# Altium PCB NB3000XN.PcbDoc (part 65 of 71)
Units mil, origin at the board's own origin, x right, y up, seen from the top; angles counter-clockwise.
Board outline 9527.56 x 6929.77 mil, 6 copper layers (Top Layer, GND+SHIELD, MidLayer1, MidLayer2, P2 - 3V3+5V0, Bottom Layer), stack 62.375 mil thick; 832 components, 1027 nets, 4655 pads, 4981 vias.
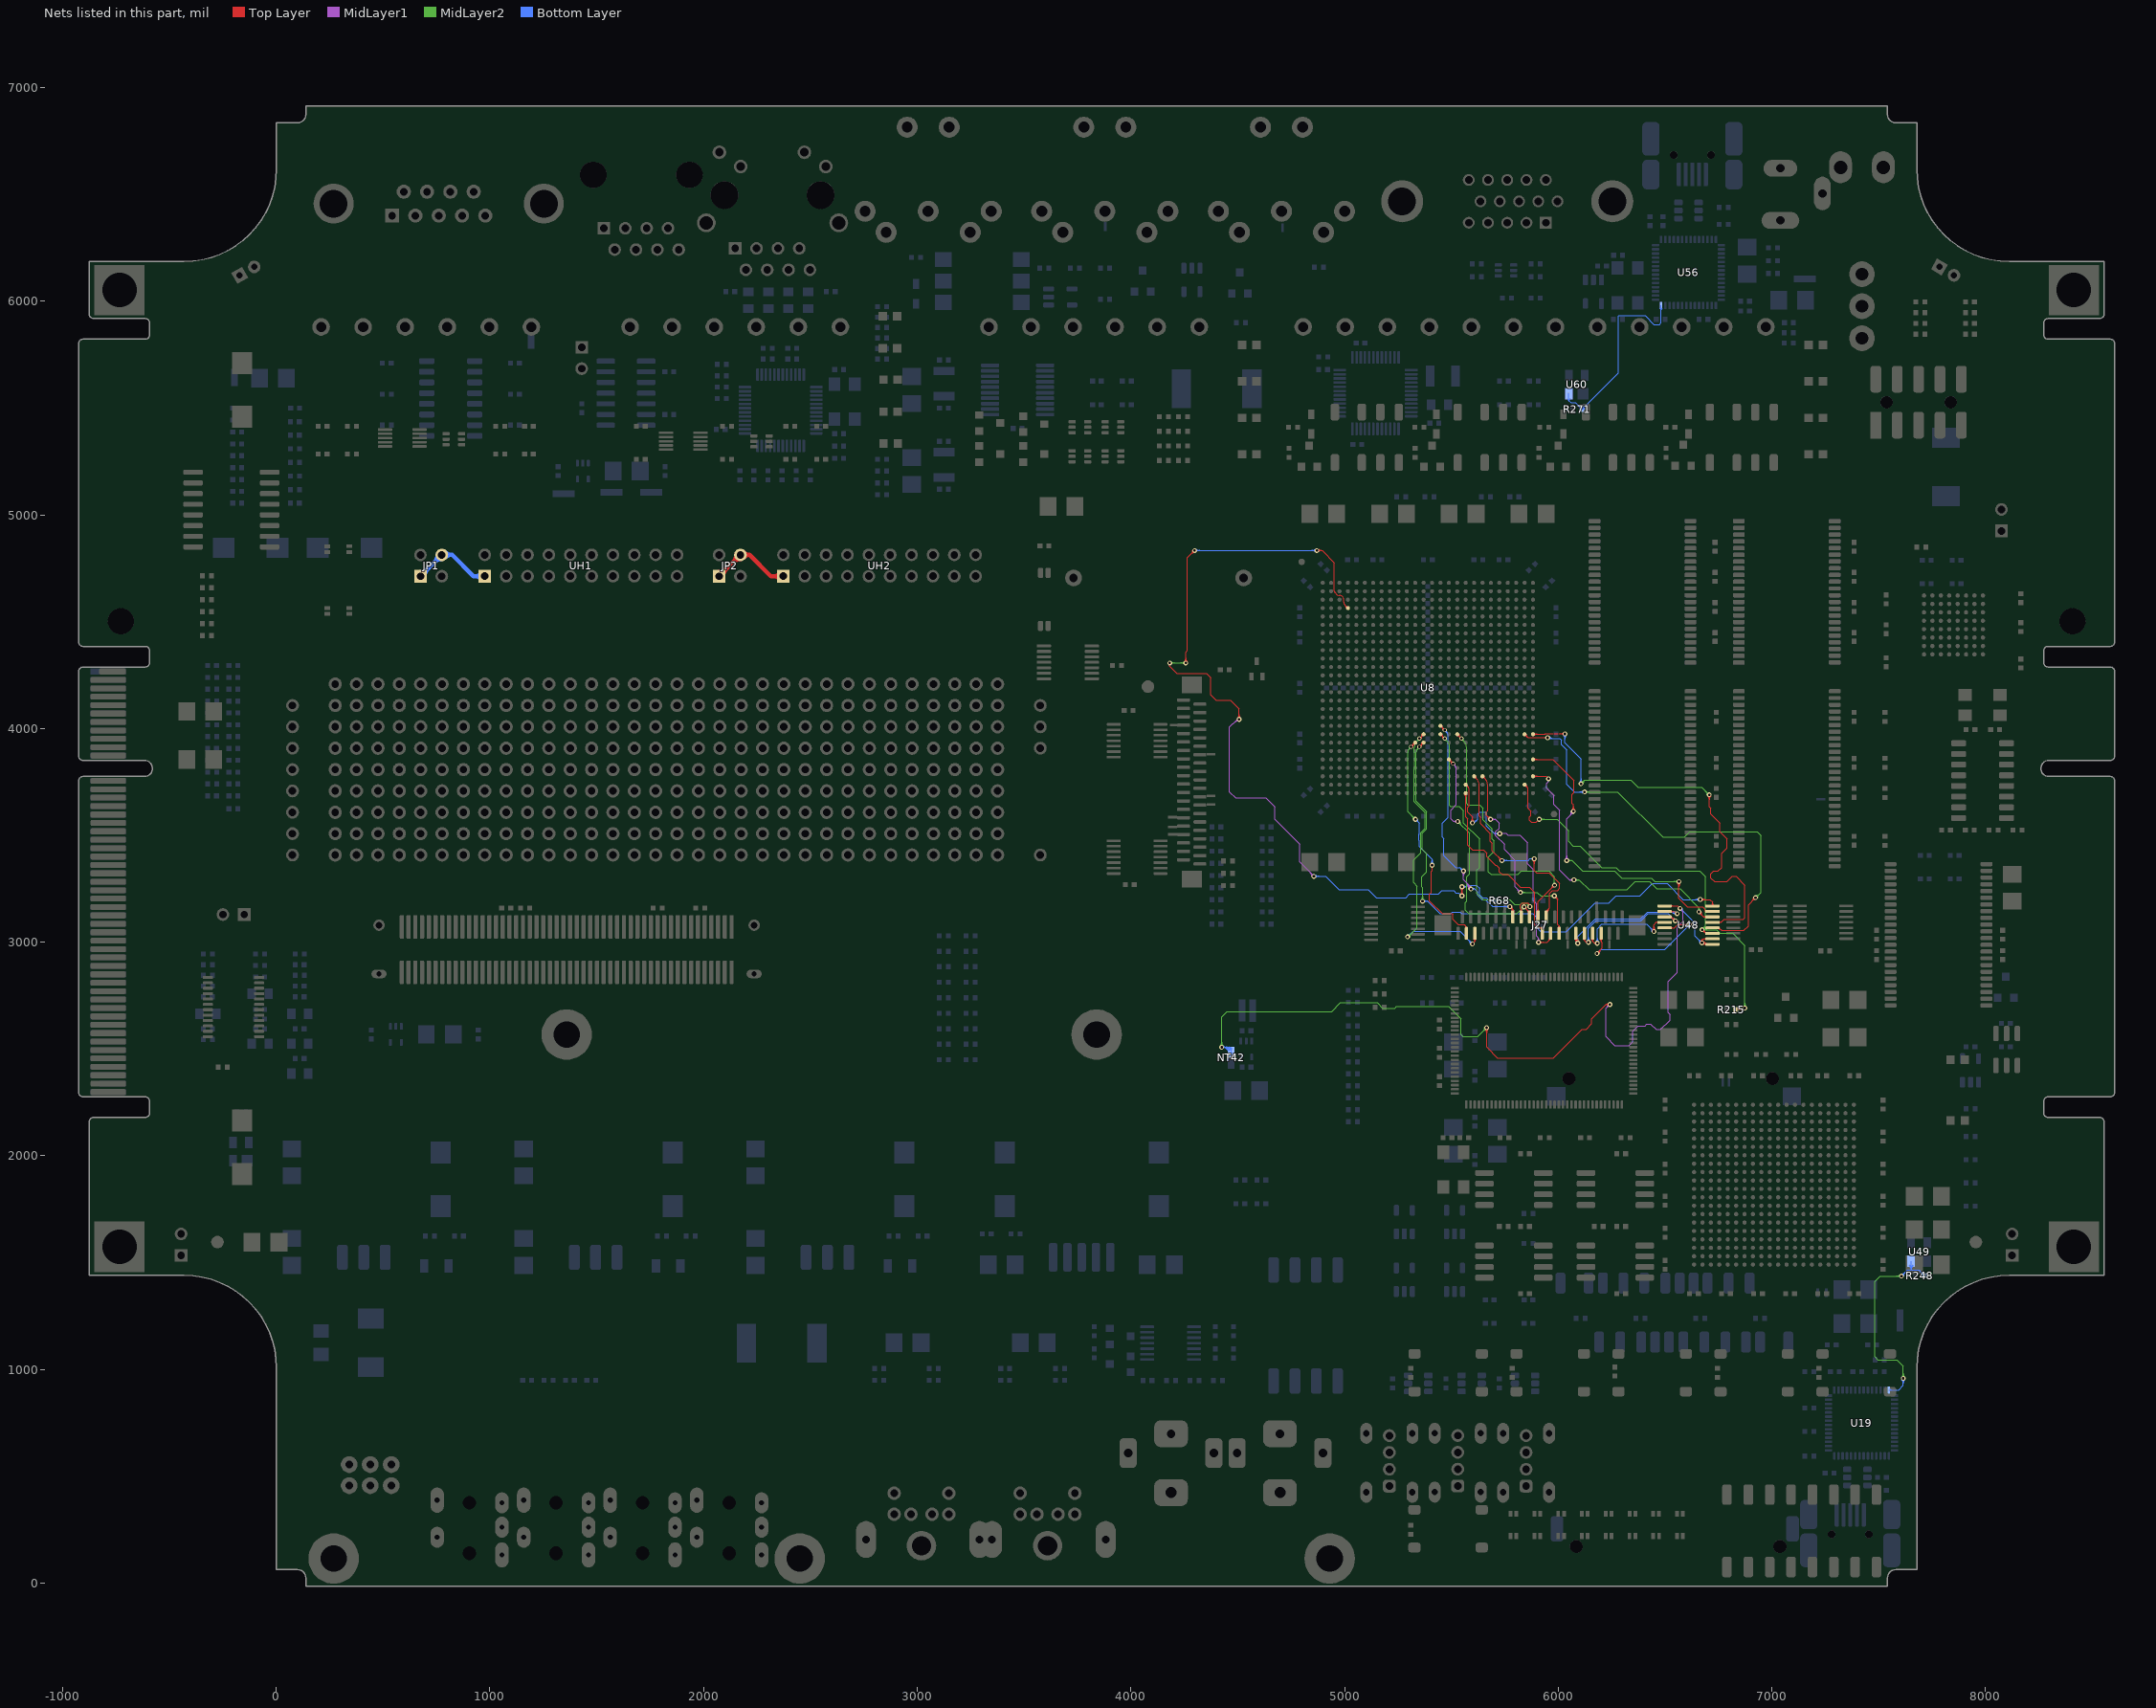
[diagram p69: the nets of this part, all layers, seen from the top]

## Via types
v1: diameter 23, hole 11.81, Top Layer to Bottom Layer, 3672 vias
v2: diameter 26, hole 11.81, Top Layer to Bottom Layer, 461 vias
v3: diameter 19, hole 11.81, Top Layer to Bottom Layer, tented both sides, 396 vias
v4: diameter 23.62, hole 11.81, Top Layer to Bottom Layer, 288 vias
v5: diameter 20, hole 11.81, Top Layer to Bottom Layer, 91 vias
v6: diameter 23, hole 11.81, Top Layer to Bottom Layer, tented both sides, 50 vias
v7: diameter 31, hole 11.81, Top Layer to Bottom Layer, 15 vias
v8: diameter 27.56, hole 11.81, Top Layer to Bottom Layer, tented both sides, 4 vias
v9: diameter 29, hole 11.81, Top Layer to Bottom Layer, 3 vias
v10: diameter 21, hole 11.81, Top Layer to Bottom Layer, 1 vias

## Nets (pads, with @x,y where several pads share a name; then routed paths per layer and width w, separated by ;. In a path a pad name is that pad's centre, name@x,y a point inside that pad or via, vN(x,y) a via of type N, cw(c..) or ccw(c..) an arc to the next point about the centre after c; other vN are vias at no path point) (continued)
TFT_IO.DB14: J27.19 U8.AD19 | length 1217.8
  Top Layer w4: U8.AD19@5606.54,3769.27 cw(c5606.54,3751.55) 5619.07,3764.08 ; U8.AD19@5613.88,3776.61 ccw(c5631.6,3776.61) 5619.07,3764.08 ; v1@5727.36,3382.37 ccw(c5704.42,3382.37) 5720.64,3398.59 ccw(c5736.86,3414.81) v1@5736.86,3391.87 ; v1@5731.36,3382.37 ccw(c5718.08,3382.37) 5727.47,3391.76 ccw(c5736.86,3401.15) v1@5736.86,3387.87 ; v1(5736.86,3382.37) 5691.19,3428.04 5691.19,3463.37 5682.86,3471.71 5682.86,3507.14 5636,3554 5636,3585.19 5630.4,3590.79 5630.4,3599 5630.4,3660 5630.4,3670 5630.4,3736.73 ccw(c5591.72,3736.73) 5619.07,3764.08 ; v1@5881.14,3383.99 cw(c5864.92,3367.77) 5887.86,3367.77 cw(c5910.79,3367.77) v1@5894.57,3383.99 ; v1@5883.97,3386.82 cw(c5874.58,3377.43) 5887.86,3377.43 cw(c5901.14,3377.43) v1@5891.75,3386.82 ; v1(5887.86,3390.71) 5887.86,3335.71 5898.52,3325.04 5956.86,3325.04 6006.86,3275.04 6006.86,3251.71 5996.86,3241.71 5973.52,3241.71 5960,3228.18 5960,3160 5944.95,3144.95 J27.19@5944.95,3118.39 ; J27.19@5946.82,3140.51 cw(c5962.05,3140.51) 5951.28,3151.28 ; J27.19@5950.82,3140.51 cw(c5975.71,3140.51) 5958.11,3158.11
  Bottom Layer w4: v1(5736.86,3382.37) 5859.96,3382.37 5868.29,3390.71 v1(5887.86,3390.71) 5887.86,3385.04 v1@5885.19,3382.37 ; v1@5740.75,3378.49 cw(c5750.14,3369.1) 5750.14,3382.37 cw(c5750.14,3395.65) v1@5740.75,3386.26 ; v1@5743.57,3375.66 cw(c5759.79,3359.44) 5759.79,3382.37 cw(c5759.79,3405.31) v1@5743.57,3389.09
TFT_IO.DB15: J27.21 U8.W17 | length 1570.7
  Top Layer w4: U8.W17@5527.8,3965.96 cw(c5527.8,3947.86) 5540.6,3960.66 cw(c5553.4,3973.46) U8.W17@5535.3,3973.46 ; U8.W17@5527.8,3966.12 cw(c5527.8,3948.4) 5540.33,3960.93 cw(c5552.86,3973.46) U8.W17@5535.14,3973.46 ; U8.W17@5527.8,3973.46 v3(5547.48,3953.78) ; J27.21@5901.42,3144.67 ccw(c5891.4,3154.69) 5905.58,3154.69 ccw(c5919.76,3154.69) J27.21@5909.73,3144.67 ; J27.21@5905.58,3118.39 5905.58,3189.43 v1(5982.86,3266.71) ; v1@5973.36,3266.71 cw(c5950.42,3266.71) 5966.64,3250.49 cw(c5982.86,3234.27) v1@5982.86,3257.21 ; v1@5977.36,3266.71 cw(c5964.08,3266.71) 5973.47,3257.32 cw(c5982.86,3247.93) v1@5982.86,3261.21 ; 5534.68,3966.58 cw(c5521.87,3953.78) 5539.98,3953.78 ccw(c5521.87,3953.78) 5534.68,3966.58 ; 5534.68,3966.58 ccw(c5547.48,3979.39) 5547.48,3961.28 cw(c5547.48,3979.39) 5534.68,3966.58
  MidLayer2 w4: v3@5546.83,3946.31 cw(c5545.25,3928.27) 5559.12,3939.91 ; v3@5554.95,3953.13 ccw(c5572.99,3951.55) 5559.12,3939.91 ; 5571.34,3680.84 5571.34,3739.1 ; v1(5982.86,3266.71) 5982.86,3307.14 5956.63,3333.37 5827.86,3333.37 5811.19,3316.71 5685.48,3316.71 5672.19,3330 5672.19,3398.04 5699.19,3425.04 5699.19,3475.04 5690.86,3483.37 5690.86,3530.02 5648.52,3572.35 5648.52,3600 5648.52,3625.71 5631.86,3642.37 5577.63,3642.37 5571.34,3648.66 5571.34,3660 5571.34,3670 5571.34,3739.1 ; 5559.12,3939.91 cw(c5529.61,3910.4) 5571.34,3910.4 5571.34,3890.9 5571.34,3816.78 5571.34,3797.36 5571.34,3739.1
TFT_IO.DB16: J27.23 U8.AB16 | length 1499.3
  Top Layer w4: U8.AB16@5488.43,3847.85 cw(c5488.43,3829.75) 5501.23,3842.55 cw(c5514.03,3855.35) U8.AB16@5495.93,3855.35 ; U8.AB16@5488.43,3848.01 cw(c5488.43,3830.29) 5500.96,3842.82 cw(c5513.49,3855.35) U8.AB16@5495.77,3855.35 ; U8.AB16@5488.43,3855.35 v3(5508.11,3835.67) ; v1@5840.19,3156.21 cw(c5840.19,3133.27) 5856.41,3149.49 cw(c5872.63,3165.71) v1@5849.69,3165.71 ; v1@5840.19,3160.21 cw(c5840.19,3146.93) 5849.58,3156.32 cw(c5858.97,3165.71) v1@5845.69,3165.71 ; v1(5840.19,3165.71) 5866.21,3139.69 J27.23@5866.21,3118.39 ; 5854.78,3151.12 ccw(c5866.21,3162.55) J27.23@5866.21,3146.39 ; 5856.76,3149.14 cw(c5848.13,3140.51) J27.23@5860.33,3140.51 ; 5495.31,3848.47 cw(c5482.5,3835.67) 5500.61,3835.67 ccw(c5482.5,3835.67) 5495.31,3848.47 ; 5495.31,3848.47 ccw(c5508.11,3861.28) 5508.11,3843.17 cw(c5508.11,3861.28) 5495.31,3848.47
  MidLayer1 w4: 5498.5,3604.17 5498.5,3601.75 ; v3@5507.46,3828.2 cw(c5505.88,3810.16) 5519.75,3821.8 cw(c5533.62,3833.44) v3@5515.58,3835.02 ; 5517.88,3565.37 cw(c5517.88,3555.43) v1@5525.68,3561.59 ; 5519.5,3822.09 cw(c5509.57,3812.16) 5523.62,3812.16 5523.62,3718.62 5523.62,3670 5523.62,3660 5523.62,3650.04 ; v1@5522.54,3559.11 ccw(c5509.63,3548.92) 5509.63,3565.37 ; v1@5522.91,3571.33 cw(c5509.63,3583.18) 5509.63,3565.37 ; 5523.52,3650.04 5523.52,3644.37 5497.5,3618.35 5497.5,3602.75 5498.5,3601.75 ; v1@5530,3565.37 5509.63,3565.37 ; 5498.5,3601.75 5498.5,3576.5 5509.63,3565.37
  MidLayer2 w4: v1@5530,3555.5 cw(c5530,3532.56) 5546.22,3548.78 cw(c5562.43,3565) v1@5539.5,3565 ; v1@5530,3559.5 cw(c5530,3546.22) 5539.39,3555.61 cw(c5548.78,3565) v1@5535.5,3565 ; v1@5531.86,3565 5531.86,3565.37 5531.48,3565 v1(5530,3565) 5585,3510 5585,3319.75 5572.5,3307.25 5572.5,3193.02 5565.19,3185.71 5565.19,3150.04 5581.86,3133.37 5807.86,3133.37 v1(5840.19,3165.71) ; v1@5830.69,3165.71 cw(c5807.76,3165.71) 5823.97,3149.49 cw(c5840.19,3133.27) v1@5840.19,3156.21 ; v1@5834.69,3165.71 cw(c5821.41,3165.71) 5830.8,3156.32 cw(c5840.19,3146.93) v1@5840.19,3160.21
TFT_IO.DB17: J27.25 U8.W15 | length 1532.1
  Top Layer w4: U8.W15@5449.06,3965.96 cw(c5449.06,3947.86) 5461.86,3960.66 cw(c5474.66,3973.46) U8.W15@5456.56,3973.46 ; U8.W15@5449.06,3966.12 cw(c5449.06,3948.4) 5461.59,3960.93 cw(c5474.12,3973.46) U8.W15@5456.4,3973.46 ; U8.W15@5449.06,3973.46 v3(5468.74,3953.78) ; J27.25@5822.76,3144.75 ccw(c5813.56,3154.31) 5826.84,3154.31 ; J27.25@5826.84,3118.39 5826.84,3154.31 ; J27.25@5830.91,3144.75 cw(c5840.11,3154.31) 5826.84,3154.31 ; 5859.36,3183.21 cw(c5849.77,3173.63) v1@5862.4,3168.71 ; 5863.69,3178.88 cw(c5856.01,3171.2) v1@5866.13,3167.25 ; v1(5867.52,3166.71) 5867.52,3175.04 5859.19,3183.37 5831.86,3183.37 5822.69,3174.21 5822.69,3158.46 5826.84,3154.31 ; 5455.94,3966.58 cw(c5443.13,3953.78) 5461.24,3953.78 ccw(c5443.13,3953.78) 5455.94,3966.58 ; 5455.94,3966.58 ccw(c5468.74,3979.39) 5468.74,3961.28 cw(c5468.74,3979.39) 5455.94,3966.58
  MidLayer2 w4: v3@5468.09,3946.31 cw(c5466.51,3928.27) 5480.38,3939.91 ; v3@5476.21,3953.13 ccw(c5494.25,3951.55) 5480.38,3939.91 ; 5492.6,3680.84 5492.6,3739.1 ; v1@5858.02,3166.71 ccw(c5835.09,3166.71) 5851.31,3182.93 ccw(c5867.52,3199.14) v1@5867.52,3176.21 ; v1@5862.02,3166.71 ccw(c5848.75,3166.71) 5858.14,3176.1 ccw(c5867.52,3185.49) v1@5867.52,3172.21 ; v1(5867.52,3166.71) 5850.86,3183.37 5830,3183.37 5823.33,3176.71 5796.86,3176.71 5773.52,3200.04 5648.52,3200.04 5619.5,3229.06 5619.5,3337.68 5631.86,3350.04 5631.86,3483.37 5556.86,3558.37 5556.86,3616.04 5556.53,3616.37 5536.9,3636 5496.6,3636 5492.6,3640 5492.6,3660 5492.6,3670 5492.6,3739.1 ; 5480.38,3939.91 cw(c5450.87,3910.4) 5492.6,3910.4 5492.6,3890.9 5492.6,3816.78 5492.6,3797.36 5492.6,3739.1
TFT_IO.IR38KRX: J27.36 U8.W13 | length 1741.3
  Top Layer w4: v3(5350.63,3953.78) U8.W13@5370.31,3973.46 ; U8.W13@5362.81,3973.46 cw(c5344.71,3973.46) 5357.51,3960.66 cw(c5370.31,3947.86) U8.W13@5370.31,3965.96 ; U8.W13@5362.97,3973.46 cw(c5345.25,3973.46) 5357.78,3960.93 cw(c5370.31,3948.4) U8.W13@5370.31,3966.12 ; v1(5598.52,2991.71) 5610.3,3003.48 J27.36@5610.3,3041.61 ; J27.36@5606.15,3015.33 cw(c5596.12,3005.31) 5610.3,3005.31 cw(c5624.48,3005.31) J27.36@5614.45,3015.33 ; 5363.43,3966.58 ccw(c5376.24,3953.78) 5358.13,3953.78 cw(c5376.24,3953.78) 5363.43,3966.58 ; 5363.43,3966.58 cw(c5350.63,3979.39) 5350.63,3961.28 ccw(c5350.63,3979.39) 5363.43,3966.58
  MidLayer2 w4: v1(5295,3025) 5298.48,3025 5298.52,3025.04 5340.19,3066.71 5340.19,3261.35 5322.52,3279.02 5322.52,3385.04 5356.7,3419.22 5356.7,3513.31 5377,3533.61 5377,3607.31 5326.77,3657.55 5326.77,3660 5326.77,3670 5326.77,3797.36 5326.77,3816.78 5326.77,3890.9 5326.77,3910.4 cw(c5368.5,3910.4) 5338.99,3939.91 ; v1@5295,3030.5 ccw(c5295,3052.19) 5310.34,3036.85 ; v1@5295,3034.5 ccw(c5295,3065.84) 5317.16,3043.68 ; v1@5304.5,3025 cw(c5319.03,3025) 5308.75,3035.27 ; v3@5343.16,3953.13 cw(c5325.12,3951.55) 5338.99,3939.91 ; v3@5351.28,3946.31 ccw(c5352.86,3928.27) 5338.99,3939.91
  Bottom Layer w4: v1(5295,3025) 5320.37,3050.37 5539.86,3050.37 v1(5598.52,2991.71) ; v1@5295,3030.5 ccw(c5295,3043.78) 5304.39,3034.39 ccw(c5313.78,3025) v1@5300.5,3025 ; v1@5295,3034.5 ccw(c5295,3057.43) 5311.22,3041.22 ccw(c5327.43,3025) v1@5304.5,3025 ; v1@5589.02,2991.71 ccw(c5566.09,2991.71) 5582.31,3007.93 ccw(c5598.52,3024.14) v1@5598.52,3001.21 ; v1@5593.02,2991.71 ccw(c5579.75,2991.71) 5589.14,3001.1 ccw(c5598.52,3010.49) v1@5598.52,2997.21
TFT_IO.IR38KTX: J27.38 U8.Y12 | length 1411.3
  Top Layer w4: v3(5311.26,3914.41) U8.Y12@5330.94,3934.09 ; U8.Y12@5323.44,3934.09 cw(c5305.34,3934.09) 5318.14,3921.29 cw(c5330.94,3908.49) U8.Y12@5330.94,3926.59 ; U8.Y12@5323.6,3934.09 cw(c5305.88,3934.09) 5318.41,3921.56 cw(c5330.94,3909.03) U8.Y12@5330.94,3926.75 ; v1(5410,3360) 5410,3334.96 5406,3330.96 5406,3232.52 5398.52,3225.04 5398.52,3191.71 5456.86,3133.37 5505.19,3133.37 5506.86,3131.71 5506.86,3107.04 5531.86,3082.04 5560.34,3082.04 5570.93,3071.45 J27.38@5570.93,3041.61 ; 5562.95,3079.44 cw(c5548.16,3064.65) J27.38@5569.06,3063.81 ; 5569.41,3072.97 cw(c5560.59,3064.15) J27.38@5573.06,3063.66 ; 5324.06,3927.21 cw(c5311.26,3940.02) 5311.26,3921.91 ccw(c5311.26,3940.02) 5324.06,3927.21 ; 5324.06,3927.21 ccw(c5336.87,3914.41) 5318.76,3914.41 cw(c5336.87,3914.41) 5324.06,3927.21
  MidLayer2 w4: 5295.75,3876.97 5295.75,3890.9 ; 5299.87,3900.83 ccw(c5309.8,3890.9) 5295.75,3890.9 ; v3@5303.79,3913.76 cw(c5285.75,3912.18) 5299.62,3900.54 cw(c5313.49,3888.9) v3@5311.91,3906.94 ; v1@5322.36,3575.04 ccw(c5299.42,3575.04) 5315.64,3591.26 ccw(c5331.86,3607.48) v1@5331.86,3584.54 ; v1@5326.36,3575.04 ccw(c5313.08,3575.04) 5322.47,3584.43 ccw(c5331.86,3593.82) v1@5331.86,3580.54 ; v1(5331.86,3575.04) 5295.75,3611.15 5295.75,3660 5295.75,3670 5295.75,3797.36 5295.75,3890.9
  Bottom Layer w4: v1@5331.86,3565.54 cw(c5331.86,3542.61) 5348.07,3558.82 cw(c5364.29,3575.04) v1@5341.36,3575.04 ; v1@5331.86,3569.54 cw(c5331.86,3556.26) 5341.25,3565.65 cw(c5350.64,3575.04) v1@5337.36,3575.04 ; v1(5331.86,3575.04) 5349.86,3557.04 5349.86,3506.14 5348.7,3504.99 5348.7,3477.23 5349.86,3476.08 5349.86,3448.37 5389.06,3409.18 5410,3388.23 v1(5410,3360) ; v1@5403.28,3366.72 ccw(c5387.06,3382.93) 5410,3382.93 ccw(c5432.93,3382.93) v1@5416.72,3366.72 ; v1@5406.11,3363.89 ccw(c5396.72,3373.28) 5410,3373.28 ccw(c5423.28,3373.28) v1@5413.89,3363.89
TFT_IO.RD: J27.16 U8.AD20 | length 1421.1
  Top Layer w4: v1@5674.02,3575.04 ccw(c5651.09,3575.04) 5667.31,3591.26 ccw(c5683.52,3607.48) v1@5683.52,3584.54 ; v1@5678.02,3575.04 ccw(c5664.75,3575.04) 5674.14,3584.43 ccw(c5683.52,3593.82) v1@5683.52,3580.54 ; v1(5683.52,3575.04) 5664.52,3594.04 5664.52,3610.46 5669.77,3615.7 5669.77,3660 5669.77,3670 5669.77,3736.73 ; v1@5981.86,3207.21 cw(c5981.86,3184.27) 5998.07,3200.49 cw(c6014.29,3216.71) v1@5991.36,3216.71 ; v1@5981.86,3211.21 cw(c5981.86,3197.93) 5991.25,3207.32 cw(c6000.64,3216.71) v1@5987.36,3216.71 ; v1(5981.86,3216.71) 5998.52,3200.04 5998.52,3083.37 6004,3077.9 ; J27.16@5999.85,3067.9 ccw(c5989.88,3077.9) 6004,3077.9 ; J27.16@6004,3041.61 6004,3077.9 ; J27.16@6008.15,3067.9 cw(c6018.12,3077.9) 6004,3077.9 ; 5658.44,3764.08 cw(c5631.09,3736.73) 5669.77,3736.73 ; 5658.44,3764.08 cw(c5631.09,3736.73) 5669.77,3736.73 ; 5658.44,3764.08 cw(c5670.97,3776.61) 5653.25,3776.61 ccw(c5670.97,3776.61) 5658.44,3764.08 ; 5658.44,3764.08 ccw(c5645.91,3751.55) 5645.91,3769.27 cw(c5645.91,3751.55) 5658.44,3764.08
  MidLayer1 w4: v1(5683.52,3575.04) 5706.86,3575.04 5723.52,3558.37 5723.52,3533.37 5706.86,3516.71 5706.86,3500.04 5748.52,3458.37 5748.52,3433.37 5798.52,3383.37 5798.52,3260.04 5823.52,3235.04 v1(5823.52,3233.37) ; v1@5687.41,3571.15 cw(c5696.8,3561.76) 5696.8,3575.04 cw(c5696.8,3588.32) v1@5687.41,3578.93 ; v1@5690.24,3568.32 cw(c5706.46,3552.11) 5706.46,3575.04 cw(c5706.46,3597.98) v1@5690.24,3581.76 ; 5806.13,3252.44 cw(c5787.07,3233.37) v1@5814.02,3233.37 ; 5810.15,3248.41 ccw(c5823.52,3261.79) v1@5823.52,3242.87 ; 5812.96,3245.61 cw(c5800.72,3233.37) v1@5818.02,3233.37
  MidLayer2 w4: v1(5823.52,3233.37) 5901.52,3233.37 5918.19,3216.71 v1(5981.86,3216.71) ; v1@5827.41,3229.49 cw(c5836.8,3220.1) 5836.8,3233.37 cw(c5836.8,3246.65) v1@5827.41,3237.26 ; v1@5830.24,3226.66 cw(c5846.46,3210.44) 5846.46,3233.37 cw(c5846.46,3256.31) v1@5830.24,3240.09 ; v1@5975.14,3209.99 ccw(c5958.92,3193.77) 5958.92,3216.71 ccw(c5958.92,3239.64) v1@5975.14,3223.43 ; v1@5977.97,3212.82 ccw(c5968.58,3203.43) 5968.58,3216.71 ccw(c5968.58,3229.99) v1@5977.97,3220.6
TFT_IO.RESET: J27.27 U8.V15 | length 1679.6
  Top Layer w4: U8.V15@5449.06,4005.33 cw(c5449.06,3987.23) 5461.86,4000.03 cw(c5474.66,4012.83) U8.V15@5456.56,4012.83 ; U8.V15@5449.06,4005.49 cw(c5449.06,3987.77) 5461.59,4000.3 cw(c5474.12,4012.83) U8.V15@5456.4,4012.83 ; U8.V15@5449.06,4012.83 v3(5468.74,3993.15) ; v1@5773.52,3157.21 cw(c5773.52,3134.27) 5789.74,3150.49 cw(c5805.96,3166.71) v1@5783.02,3166.71 ; v1@5773.52,3161.21 cw(c5773.52,3147.93) 5782.91,3157.32 cw(c5792.3,3166.71) v1@5779.02,3166.71 ; v1(5773.52,3166.71) 5790.19,3150.04 ; v1@5775.6,3164.63 cw(c5751.49,3140.51) J27.27@5785.59,3140.51 ; 5782.43,3157.8 cw(c5765.14,3140.51) J27.27@5789.59,3140.51 ; J27.27@5786.86,3146.35 ccw(c5786.49,3150.04) 5790.19,3150.04 ; J27.27@5787.47,3118.39 5787.47,3116.71 5790.19,3116.71 5790.19,3118.39 5790.19,3150.04 ; 5789.26,3150.97 cw(c5778.8,3140.51) J27.27@5793.59,3140.51 ; J27.27@5790.19,3148.12 ccw(c5795.07,3148.12) J27.27@5791.62,3144.67 ; 5455.94,4005.95 cw(c5443.13,3993.15) 5461.24,3993.15 ccw(c5443.13,3993.15) 5455.94,4005.95 ; 5455.94,4005.95 ccw(c5468.74,4018.76) 5468.74,4000.65 cw(c5468.74,4018.76) 5455.94,4005.95
  MidLayer1 w4: v1@5550.14,3326.66 cw(c5533.92,3310.44) 5556.86,3310.44 cw(c5579.79,3310.44) v1@5563.57,3326.66 ; v1@5552.97,3329.49 cw(c5543.58,3320.1) 5556.86,3320.1 cw(c5570.14,3320.1) v1@5560.75,3329.49 ; v1(5556.86,3333.37) 5556.86,3293.04 5591.52,3258.37 v1(5591.52,3249) ; 5568.68,3281.22 cw(c5536.46,3249) v1@5582.02,3249 ; 5575.51,3274.39 cw(c5550.11,3249) v1@5586.02,3249 ; 5582.33,3267.56 cw(c5563.77,3249) v1@5590.02,3249 ; 5589.16,3260.74 cw(c5577.43,3249) v1@5594.02,3249
  Bottom Layer w4: v3@5468.09,3985.68 cw(c5466.51,3967.64) 5480.38,3979.28 cw(c5494.25,3990.92) v3@5476.21,3992.5 ; 5480.13,3979.57 cw(c5470.2,3969.64) 5484.25,3969.64 5484.25,3876.1 5484.25,3670 5484.25,3660 5484.25,3584.76 5457.8,3558.31 5457.8,3491.44 5465.19,3484.05 5465.19,3406.12 5521.31,3350 5540.23,3350 v1(5556.86,3333.37) ; v1@5547.36,3333.37 ccw(c5524.42,3333.37) 5540.64,3349.59 ccw(c5556.86,3365.81) v1@5556.86,3342.87 ; v1@5551.36,3333.37 ccw(c5538.08,3333.37) 5547.47,3342.76 ccw(c5556.86,3352.15) v1@5556.86,3338.87 ; v1(5591.52,3249) 5591.52,3250.04 5608.19,3250.04 ; v1@5599.19,3254.61 ccw(c5608.19,3261.19) 5608.19,3250.04 ; v1@5600.11,3244.93 cw(c5608.19,3241.1) 5608.19,3250.04 ; v1@5766.81,3159.99 ccw(c5750.59,3143.77) 5750.59,3166.71 ccw(c5750.59,3189.64) v1@5766.81,3173.43 ; v1@5769.64,3162.82 ccw(c5760.25,3153.43) 5760.25,3166.71 ccw(c5760.25,3179.99) v1@5769.64,3170.6 ; v1(5773.52,3166.71) 5692.52,3166.71 5660.19,3199.04 5642.88,3199.04 5623.52,3218.39 5623.52,3234.71 5608.19,3250.04
TFT_IO.RS: J27.20 U8.AF18 | length 971.7
  Top Layer w4: U8.AF18@5561.86,3692.57 cw(c5549.06,3679.77) 5567.17,3679.77 cw(c5585.27,3679.77) U8.AF18@5572.47,3692.57 ; U8.AF18@5561.97,3692.68 cw(c5549.44,3680.15) 5567.17,3680.15 cw(c5584.89,3680.15) U8.AF18@5572.36,3692.68 ; U8.AF18@5567.17,3697.87 5567.17,3670 5567.17,3660 5567.17,3586.59 5576.81,3576.94 5576.81,3455.34 5599.61,3432.54 5649.36,3432.54 5649.52,3432.37 5665.19,3416.71 5665.19,3401.71 5705.86,3361.04 5710.19,3361.04 5723.52,3347.71 5723.52,3330 5736.82,3316.71 5765.19,3316.71 5823.52,3258.37 5865.19,3258.37 5890.19,3233.37 5890.19,3080.71 5893.19,3077.71 5904.19,3077.71 5923.52,3058.37 5923.52,3041.71 5925.26,3041.71 J27.20@5925.26,3041.61 ; 5907.74,3074.16 ccw(c5920.1,3086.51) J27.20@5923.96,3069.47 ; 5912.87,3069.03 ccw(c5922,3078.15) J27.20@5924.85,3065.57
TFT_IO.WR: J27.18 U8.AE18 | length 1481.3
  Top Layer w4: U8.AE18@5567.17,3729.9 cw(c5567.17,3712.17) 5579.7,3724.71 ; U8.AE18@5574.51,3737.24 ccw(c5592.23,3737.24) 5579.7,3724.71 ; v1@5590.19,3558.37 v1(5598.52,3558.37) 5598.52,3586 5576.69,3607.83 5576.69,3631.96 5582.67,3637.94 5582.67,3660 5582.67,3670 5582.67,3717.53 ccw(c5572.52,3717.53) 5579.7,3724.71 ; v1@5591.81,3565.09 ccw(c5575.59,3581.31) 5598.52,3581.31 ccw(c5621.46,3581.31) v1@5605.24,3565.09 ; v1@5594.64,3562.26 ccw(c5585.25,3571.65) 5598.52,3571.65 ccw(c5611.8,3571.65) v1@5602.41,3562.26 ; v1(5907.86,2999.04) 5947.52,2999.04 5965.19,3016.71 5965.19,3041.61 5965.19,3041.71 5964.63,3041.71 J27.18@5964.63,3041.61 ; v1@5911.75,2995.15 cw(c5921.14,2985.76) 5921.14,2999.04 cw(c5921.14,3012.32) v1@5911.75,3002.93 ; v1@5914.57,2992.32 cw(c5930.79,2976.11) 5930.79,2999.04 cw(c5930.79,3021.98) v1@5914.57,3005.76 ; 5952.24,3003.76 ccw(c5936.52,3019.49) J27.18@5958.76,3019.49 ; 5959.07,3010.59 ccw(c5950.17,3019.49) J27.18@5962.76,3019.49 ; J27.18@5960.3,3011.82 cw(c5964.63,3007.49) J27.18@5964.63,3013.61
  MidLayer1 w4: v1(5726.52,3508.37) 5727.52,3509.37 5756.86,3509.37 5765.19,3501.04 5820.52,3501.04 5856.86,3464.71 5856.86,3395 5856.86,3366.83 5882.86,3340.83 5882.86,3324.04 5882.86,3315 5882.86,3194.69 5898.19,3179.36 5898.19,3027.75 5907.86,3018.08 ; v1@5902.14,3006.63 ccw(c5893.53,3018.08) 5907.86,3018.08 ; v1(5907.86,2999.04) 5907.86,3018.08 ; v1@5913.57,3006.63 cw(c5922.18,3018.08) 5907.86,3018.08
  Bottom Layer w4: v1(5598.52,3558.37) 5606.86,3558.37 5623.52,3575.04 ; v1@5598.79,3559.85 ccw(c5601.57,3575.34) 5612.7,3564.21 ; v1@5599.5,3563.79 ccw(c5603.22,3584.52) 5618.11,3569.63 ; v1@5600.2,3567.73 ccw(c5604.86,3593.7) 5623.52,3575.04 ; v1@5719.81,3501.66 ccw(c5703.59,3485.44) 5703.59,3508.37 ccw(c5703.59,3531.31) v1@5719.81,3515.09 ; v1@5722.64,3504.49 ccw(c5713.25,3495.1) 5713.25,3508.37 ccw(c5713.25,3521.65) v1@5722.64,3512.26 ; v1@5724.86,3500.04 5726.52,3501.71 v1(5726.52,3508.37) 5701.63,3508.37 5664.96,3545.04 5664.86,3545.04 5664.86,3606.71 5663.19,3608.37 5631.86,3608.37 5623.52,3600.04 5623.52,3575.04
TFT_TOUCH.X+: J27.12 U48.2 | length 995.1
  Top Layer w4: J27.12@6078.59,3015.33 cw(c6068.56,3005.31) 6082.74,3005.31 cw(c6096.92,3005.31) J27.12@6086.9,3015.33 ; 6082.74,3010.54 ccw(c6106.69,3010.54) v1@6089.76,2993.61 ; J27.12@6082.74,3020.2 ccw(c6116.35,3020.2) v1@6092.58,2996.44 ; J27.12@6082.74,3029.85 ccw(c6126,3029.85) v1@6095.41,2999.26 ; J27.12@6082.74,3039.51 ccw(c6135.66,3039.51) v1@6098.24,3002.09 ; J27.12@6082.74,3041.61 6082.74,3004.16 v1(6091.52,2995.37) ; U48.2@6497.8,3143.98 6546.26,3143.98 v1(6556.86,3133.37) ; U48.2@6527.83,3140.52 cw(c6536.17,3132.17) 6536.17,3143.98 cw(c6536.18,3155.78) U48.2@6527.83,3147.43
  Bottom Layer w4: v1@6084.81,3002.09 ccw(c6068.59,3018.31) 6091.52,3018.31 ccw(c6114.46,3018.31) v1@6098.24,3002.09 ; v1@6087.64,2999.26 ccw(c6078.25,3008.65) 6091.52,3008.65 ccw(c6104.8,3008.65) v1@6095.41,2999.26 ; v1(6091.52,2995.37) 6091.52,3026.06 6173.84,3108.37 6384.84,3108.37 6418.17,3141.71 6445,3141.71 6548.52,3141.71 v1(6556.86,3133.37) ; 6513.8,3141.71 cw(c6513.8,3090.32) v1@6550.14,3126.66 ; 6523.46,3141.71 cw(c6523.46,3099.98) v1@6552.97,3129.49 ; 6533.12,3141.71 cw(c6533.12,3109.64) v1@6555.8,3132.31 ; 6542.78,3141.71 cw(c6542.78,3119.29) v1@6558.62,3135.14
TFT_TOUCH.X-: J27.8 U48.4 | length 714.7
  Top Layer w4: J27.8@6157.33,3015.33 cw(c6147.3,3005.31) 6161.48,3005.31 cw(c6175.66,3005.31) J27.8@6165.64,3015.33 ; J27.8@6161.48,3041.61 6161.48,3003.37 6169.48,2995.37 v1(6183.19,2995.37) ; v1@6441.81,3056.76 ccw(c6425.59,3072.98) 6448.52,3072.98 ccw(c6471.46,3072.98) v1@6455.24,3056.76 ; v1@6444.64,3053.93 ccw(c6435.25,3063.32) 6448.52,3063.32 ccw(c6461.8,3063.32) v1@6452.41,3053.93 ; v1(6448.52,3050.04) 6448.52,3081.37 6459.94,3092.79 ; U48.4@6467.65,3089.45 ccw(c6459.94,3082.24) 6459.94,3092.79 ; U48.4@6467.65,3096.14 cw(c6459.94,3103.35) 6459.94,3092.79 ; U48.4@6497.8,3092.8 6459.94,3092.79
  Bottom Layer w4: v1@6176.47,3002.09 ccw(c6160.26,3018.31) 6183.19,3018.31 ccw(c6206.13,3018.31) v1@6189.91,3002.09 ; v1@6179.3,2999.26 ccw(c6169.91,3008.65) 6183.19,3008.65 ccw(c6196.47,3008.65) v1@6187.08,2999.26 ; v1(6183.19,2995.37) 6183.19,3063.19 6204.04,3084.04 6414.52,3084.04 v1(6448.52,3050.04) ; v1@6439.02,3050.04 ccw(c6416.09,3050.04) 6432.31,3066.26 ccw(c6448.52,3082.48) v1@6448.52,3059.54 ; v1@6443.02,3050.04 ccw(c6429.75,3050.04) 6439.14,3059.43 ccw(c6448.52,3068.82) v1@6448.52,3055.54
TFT_TOUCH.Y+: J27.10 U48.3 | length 846.7
  Top Layer w4: J27.10@6118.8,3014.63 cw(c6114.54,3008.38) 6122.11,3008.38 ; J27.10@6122.11,3041.61 6122.11,3008.37 ; J27.10@6125.42,3014.63 ccw(c6129.69,3008.38) 6122.11,3008.38 ; v1(6141.52,3000.04) 6130.45,3000.04 6122.11,3008.37 ; U48.3@6497.8,3118.39 6530.18,3118.39 v1(6548.52,3100.04) ; U48.3@6524.37,3113.5 cw(c6524.37,3087.67) v1@6542.63,3105.93 ; U48.3@6524.37,3117.5 cw(c6524.37,3101.32) 6535.81,3112.76 ; v1@6539.02,3100.04 ccw(c6516.09,3100.04) 6532.31,3116.26 ccw(c6548.52,3132.48) v1@6548.52,3109.54 ; v1@6543.02,3100.04 ccw(c6529.75,3100.04) 6539.14,3109.43 ccw(c6548.52,3118.82) v1@6548.52,3105.54
  Bottom Layer w4: v1@6134.81,3006.76 ccw(c6118.59,3022.98) 6141.52,3022.98 ccw(c6164.46,3022.98) v1@6148.24,3006.76 ; v1@6137.64,3003.93 ccw(c6128.25,3013.32) 6141.52,3013.32 ccw(c6154.8,3013.32) v1@6145.41,3003.93 ; v1(6141.52,3000.04) 6141.52,3064.75 6176.82,3100.04 6387.82,3100.04 6421.15,3133.37 6465,3133.37 6515.19,3133.37 v1(6548.52,3100.04) ; v1@6539.02,3100.04 ccw(c6516.09,3100.04) 6532.31,3116.26 ccw(c6548.52,3132.48) v1@6548.52,3109.54 ; v1@6543.02,3100.04 ccw(c6529.75,3100.04) 6539.14,3109.43 ccw(c6548.52,3118.82) v1@6548.52,3105.54
TFT_TOUCH.Y-: J27.6 U48.5 | length 989.2
  Top Layer w4: v1(6181.86,2947.37) 6206.86,2972.37 6206.86,2995 6200.85,3001 J27.6@6200.85,3041.61 ; v1@6181.86,2952.87 ccw(c6181.86,2966.15) 6191.25,2956.76 ccw(c6200.64,2947.37) v1@6187.36,2947.37 ; v1@6181.86,2956.87 ccw(c6181.86,2979.81) 6198.07,2963.59 ccw(c6214.29,2947.37) v1@6191.36,2947.37 ; J27.6@6196.7,3015.33 cw(c6186.67,3005.31) 6200.85,3005.31 cw(c6215.03,3005.31) J27.6@6205.01,3015.33 ; U48.5@6497.8,3067.2 6543.67,3067.2 6559.84,3083.37 v1(6615.19,3083.37) ; U48.5@6527.83,3063.75 cw(c6536.17,3055.4) 6536.17,3067.2 cw(c6536.17,3079.01) U48.5@6527.83,3070.66 ; v1@6608.47,3076.66 ccw(c6592.26,3060.44) 6592.26,3083.37 ccw(c6592.26,3106.31) v1@6608.47,3090.09 ; v1@6611.3,3079.49 ccw(c6601.91,3070.1) 6601.91,3083.37 ccw(c6601.91,3096.65) v1@6611.3,3087.26
  Bottom Layer w4: v1(6181.86,2947.37) 6201.19,2966.71 6498.52,2966.71 v1(6615.19,3083.37) ; v1@6181.86,2952.87 ccw(c6181.86,2966.15) 6191.25,2956.76 ccw(c6200.64,2947.37) v1@6187.36,2947.37 ; v1@6181.86,2956.87 ccw(c6181.86,2979.81) 6198.07,2963.59 ccw(c6214.29,2947.37) v1@6191.36,2947.37 ; v1@6605.69,3083.37 cw(c6582.76,3083.37) 6598.97,3067.16 cw(c6615.19,3050.94) v1@6615.19,3073.87 ; v1@6609.69,3083.37 cw(c6596.41,3083.37) 6605.8,3073.99 cw(c6615.19,3064.6) v1@6615.19,3077.87
TFT_TSC.BUSY: U8.W26 U48.13 | length 2439.4
  Top Layer w4: U8.W26@5882.13,3973.46 5910,3973.46 5920,3973.46 5924.74,3973.46 5938.61,3973.46 5940.19,3975.04 v1(6031.86,3975.04) ; U8.W26@5887.32,3968.27 cw(c5899.85,3955.74) 5899.85,3973.46 cw(c5899.85,3991.19) U8.W26@5887.32,3978.66 ; U8.W26@5887.43,3968.16 cw(c5900.23,3955.36) 5900.23,3973.46 cw(c5900.23,3991.57) U8.W26@5887.43,3978.77 ; v1@6025.14,3968.32 ccw(c6008.92,3952.11) 6008.92,3975.04 ccw(c6008.92,3997.98) v1@6025.14,3981.76 ; v1@6027.97,3971.15 ccw(c6018.58,3961.76) 6018.58,3975.04 ccw(c6018.58,3988.32) v1@6027.97,3978.93 ; v1@6700.14,3683.32 cw(c6683.92,3667.11) 6706.86,3667.11 cw(c6729.79,3667.11) v1@6713.57,3683.32 ; v1@6702.97,3686.15 cw(c6693.58,3676.76) 6706.86,3676.76 cw(c6720.14,3676.76) v1@6710.75,3686.15 ; v1(6706.86,3690.04) 6706.86,3634.33 6715.19,3626 6715.19,3600.04 6756.86,3558.37 6756.86,3516.71 6790.19,3483.37 6790.19,3441.71 6765.19,3416.71 6765.19,3350.04 6748.52,3333.37 6728.52,3333.37 6715.19,3320.04 6715.19,3300.04 6731.86,3283.37 6790.19,3283.37 6815.19,3308.37 6831.86,3308.37 6873.52,3266.71 6873.52,3113.52 6866.71,3106.71 6777.58,3106.71 6763.67,3092.79 U48.13@6722.2,3092.8 ; U48.13@6752.24,3089.34 cw(c6760.58,3080.99) 6760.58,3092.79 cw(c6760.59,3104.6) U48.13@6752.24,3096.25
  MidLayer2 w4: v1(6106.86,3741.71) 6123.52,3758.37 6341.19,3758.37 6374.52,3725.04 6671.86,3725.04 v1(6706.86,3690.04) ; v1@6106.86,3747.21 ccw(c6106.86,3760.49) 6116.25,3751.1 ccw(c6125.64,3741.71) v1@6112.36,3741.71 ; v1@6106.86,3751.21 ccw(c6106.86,3774.14) 6123.07,3757.93 ccw(c6139.29,3741.71) v1@6116.36,3741.71 ; v1@6697.36,3690.04 ccw(c6674.42,3690.04) 6690.64,3706.26 ccw(c6706.86,3722.48) v1@6706.86,3699.54 ; v1@6701.36,3690.04 ccw(c6688.08,3690.04) 6697.47,3699.43 ccw(c6706.86,3708.82) v1@6706.86,3695.54
  Bottom Layer w4: v1@6025.14,3968.32 cw(c6008.92,3952.11) 6031.86,3952.11 cw(c6054.79,3952.11) v1@6038.57,3968.32 ; v1@6027.97,3971.15 cw(c6018.58,3961.76) 6031.86,3961.76 cw(c6045.14,3961.76) v1@6035.75,3971.15 ; v1(6031.86,3975.04) 6031.86,3933.37 6106.86,3858.37 v1(6106.86,3741.71) ; v1@6100.14,3748.43 ccw(c6083.92,3764.64) 6106.86,3764.64 ccw(c6129.79,3764.64) v1@6113.57,3748.43 ; v1@6102.97,3745.6 ccw(c6093.58,3754.99) 6106.86,3754.99 ccw(c6120.14,3754.99) v1@6110.75,3745.6
TFT_TSC.CLK: U8.Y13 U48.16 | length 2771.2
  Top Layer w4: v3(5350.63,3914.41) U8.Y13@5370.31,3934.09 ; U8.Y13@5362.81,3934.09 cw(c5344.71,3934.09) 5357.51,3921.29 cw(c5370.31,3908.49) U8.Y13@5370.31,3926.59 ; U8.Y13@5362.97,3934.09 cw(c5345.25,3934.09) 5357.78,3921.56 cw(c5370.31,3909.03) U8.Y13@5370.31,3926.75 ; v1(6665.19,3200.04) 6709.96,3200.04 6722.2,3187.8 U48.16@6722.2,3169.57 ; v1@6669.08,3196.15 cw(c6678.47,3186.76) 6678.47,3200.04 cw(c6678.47,3213.32) v1@6669.08,3203.93 ; v1@6671.91,3193.32 cw(c6688.13,3177.11) 6688.13,3200.04 cw(c6688.13,3222.98) v1@6671.91,3206.76 ; U48.16@6718.75,3173.02 ccw(c6710.4,3181.37) 6722.2,3181.37 ccw(c6734.01,3181.37) U48.16@6725.66,3173.02 ; 5363.43,3927.21 cw(c5350.63,3940.02) 5350.63,3921.91 ccw(c5350.63,3940.02) 5363.43,3927.21 ; 5363.43,3927.21 ccw(c5376.24,3914.41) 5358.13,3914.41 cw(c5376.24,3914.41) 5363.43,3927.21
  MidLayer2 w4: 5335.12,3660.51 5385,3610.63 ; 5335.12,3661 5335.12,3671 ; 5335.12,3670 5335.12,3797.36 5335.12,3890.9 cw(c5349.17,3890.9) 5339.24,3900.83 ; v3@5343.16,3913.76 cw(c5325.12,3912.18) 5338.99,3900.54 cw(c5352.86,3888.9) v3@5351.28,3906.94 ; v1@5358.47,3198.43 ccw(c5342.26,3214.64) 5365.19,3214.64 ccw(c5388.13,3214.64) v1@5371.91,3198.43 ; v1@5361.3,3195.6 ccw(c5351.91,3204.99) 5365.19,3204.99 ccw(c5378.47,3204.99) v1@5369.08,3195.6 ; v1(5365.19,3191.71) 5365.19,3257.31 5362.5,3260 5362.5,3306.35 5384.5,3328.35 5384.5,3415.06 5364.7,3434.86 5364.7,3510 5385,3530.3 5385,3610.63 ; 5385,3611.31 5385,3610.63
  Bottom Layer w4: v1(5365.19,3191.71) 5389.52,3191.71 5447.86,3133.37 5497.52,3133.37 5505.86,3141.71 5541.19,3141.71 5549.86,3133.04 5882.19,3133.04 5906.86,3108.37 5906.86,3063.37 5920.19,3050.04 6038.9,3050.04 6172.23,3183.37 6237.21,3183.37 6270.54,3216.71 6381.86,3216.71 6440.52,3275.37 6510,3275.37 6585.33,3200.04 v1(6665.19,3200.04) ; v1@5369.08,3187.82 cw(c5378.47,3178.43) 5378.47,3191.71 cw(c5378.47,3204.99) v1@5369.08,3195.6 ; v1@5371.91,3184.99 cw(c5388.13,3168.77) 5388.13,3191.71 cw(c5388.13,3214.64) v1@5371.91,3198.43 ; v1@6658.47,3193.32 ccw(c6642.26,3177.11) 6642.26,3200.04 ccw(c6642.26,3222.98) v1@6658.47,3206.76 ; v1@6661.3,3196.15 ccw(c6651.91,3186.76) 6651.91,3200.04 ccw(c6651.91,3213.32) v1@6661.3,3203.93
TFT_TSC.CS_N: U8.AB26 U48.15 | length 1882
  Top Layer w4: U8.AB26@5882.13,3855.35 5910,3855.35 5920,3855.35 5975.25,3855.35 6044.7,3785.91 6073.52,3757.08 6073.52,3700.04 6065.19,3691.71 6065.19,3649.81 ; U8.AB26@5887.32,3850.16 cw(c5899.85,3837.63) 5899.85,3855.35 cw(c5899.85,3873.08) U8.AB26@5887.32,3860.55 ; U8.AB26@5887.43,3850.05 cw(c5900.23,3837.25) 5900.23,3855.35 cw(c5900.23,3873.46) U8.AB26@5887.43,3860.66 ; v1@6064.14,3619.43 ccw(c6047.92,3635.64) 6070.86,3635.64 ccw(c6093.79,3635.64) v1@6077.57,3619.43 ; 6065,3650 6065.19,3649.81 ; v1@6066.97,3616.6 ccw(c6057.58,3625.99) 6070.86,3625.99 ccw(c6084.14,3625.99) v1@6074.75,3616.6 ; v1(6070.86,3612.71) 6070.86,3644.14 6065.19,3649.81 ; v1@6558.47,3276.66 cw(c6542.26,3260.44) 6565.19,3260.44 cw(c6588.13,3260.44) v1@6571.91,3276.66 ; v1@6561.3,3279.49 cw(c6551.91,3270.1) 6565.19,3270.1 cw(c6578.47,3270.1) v1@6569.08,3279.49 ; v1(6565.19,3283.37) 6565.19,3204.81 6605,3165 6675.23,3165 6696.26,3143.98 U48.15@6722.2,3143.98 ; 6686.84,3153.39 cw(c6677.43,3143.98) U48.15@6690.74,3143.98 ; 6688.35,3151.88 ccw(c6695.63,3159.16) U48.15@6695.63,3148.87
  MidLayer1 w4: v1@6033.47,3389.09 ccw(c6017.26,3405.31) 6040.19,3405.31 ccw(c6063.13,3405.31) v1@6046.91,3389.09 ; v1@6036.3,3386.26 ccw(c6026.91,3395.65) 6040.19,3395.65 ccw(c6053.47,3395.65) v1@6044.08,3386.26 ; v1(6040.19,3382.37) 6040.19,3576.71 6071.86,3608.37 6071.86,3611.71 v1(6070.86,3612.71) ; 6050.87,3587.39 ccw(c6025.55,3612.71) v1@6061.36,3612.71 ; 6057.7,3594.21 ccw(c6039.2,3612.71) v1@6065.36,3612.71 ; 6063.74,3600.26 cw(c6070.86,3593.15) v1@6070.86,3603.21 ; 6064.53,3601.04 ccw(c6052.86,3612.71) v1@6069.36,3612.71
  MidLayer2 w4: v1(6040.19,3382.37) 6065.19,3382.37 6114.19,3333.37 6264.58,3333.37 6297.92,3300.04 6435.86,3300.04 6452.52,3283.37 v1(6565.19,3283.37) ; v1@6044.08,3378.49 cw(c6053.47,3369.1) 6053.47,3382.37 cw(c6053.47,3395.65) v1@6044.08,3386.26 ; v1@6046.91,3375.66 cw(c6063.13,3359.44) 6063.13,3382.37 cw(c6063.13,3405.31) v1@6046.91,3389.09 ; v1@6558.47,3276.66 ccw(c6542.26,3260.44) 6542.26,3283.37 ccw(c6542.26,3306.31) v1@6558.47,3290.09 ; v1@6561.3,3279.49 ccw(c6551.91,3270.1) 6551.91,3283.37 ccw(c6551.91,3296.65) v1@6561.3,3287.26
TFT_TSC.DIN: U8.AD26 U48.14 | length 1658.2
  Top Layer w4: U8.AD26@5882.13,3776.61 5910,3776.61 5920,3776.61 5943.39,3776.61 v1(5955,3765) ; U8.AD26@5887.32,3771.42 cw(c5899.85,3758.89) 5899.85,3776.61 cw(c5899.85,3794.34) U8.AD26@5887.32,3781.81 ; U8.AD26@5887.43,3771.31 cw(c5900.23,3758.51) 5900.23,3776.61 cw(c5900.23,3794.72) U8.AD26@5887.43,3781.92 ; v1@6658.86,3132.21 cw(c6658.86,3114.1) 6671.66,3126.9 ; v1(6658.86,3141.71) 6658.86,3139.71 6680.18,3118.39 U48.14@6722.2,3118.39 ; v1@6664.36,3141.71 ccw(c6682.46,3141.71) 6669.66,3128.9 ; v1@6668.36,3141.71 ccw(c6696.12,3141.71) 6676.49,3122.08 ; U48.14@6692.17,3114.93 ccw(c6683.83,3106.58) 6683.83,3118.39 ccw(c6683.83,3130.19) U48.14@6692.17,3121.84
  MidLayer1 w4: v1(5955,3765) 5955,3751.43 5946.19,3742.62 5946.19,3720.71 5948.52,3718.37 5979.19,3687.71 5979.19,3644.37 6006.86,3616.71 6006.86,3338.14 6053.29,3291.71 ; v1@6066.21,3285.64 ccw(c6053.29,3274.92) 6053.29,3291.71 ; v1@6066.21,3297.78 cw(c6053.29,3308.5) 6053.29,3291.71 ; v1@6069.29,3288.2 ccw(c6061.81,3281.99) 6061.81,3291.71 ccw(c6061.81,3301.43) v1@6069.29,3295.22 ; v1(6073.52,3291.71) 6053.29,3291.71
  MidLayer2 w4: v1(6073.52,3291.71) 6098.52,3291.71 6144.43,3245.8 6322.26,3245.8 6360.17,3283.71 6428.54,3283.71 6461.88,3250.37 6570.21,3250.37 6658.86,3161.73 ; v1@6077.41,3287.82 cw(c6086.8,3278.43) 6086.8,3291.71 cw(c6086.8,3304.99) v1@6077.41,3295.6 ; v1@6080.24,3284.99 cw(c6096.46,3268.77) 6096.46,3291.71 cw(c6096.46,3314.64) v1@6080.24,3298.43 ; v1@6652.85,3149.07 ccw(c6642.52,3161.73) 6658.86,3161.73 ; v1@6655.38,3145.97 ccw(c6649.4,3153.3) 6658.86,3153.3 ccw(c6668.32,3153.3) v1@6662.34,3145.97 ; v1(6658.86,3141.71) 6658.86,3161.73 ; v1@6664.86,3149.07 cw(c6675.2,3161.73) 6658.86,3161.73
TFT_TSC.DOUT: U8.W25 U48.12 | length 2418.5
  Top Layer w4: U8.W25@5842.76,3966.12 cw(c5842.76,3948.4) 5855.29,3960.93 ; U8.W25@5850.1,3973.46 ccw(c5867.83,3973.46) 5855.29,3960.93 ; v1(5950.52,3957.37) 5949.52,3958.37 5949.11,3957.96 5920,3957.96 5910,3957.96 5862.47,3957.96 cw(c5862.47,3968.11) 5855.29,3960.93 ; U48.12@6722.2,3067.2 6752.8,3067.2 6765.29,3054.71 6869.86,3054.71 6890.19,3075.04 6890.19,3175.04 v1(6923.52,3208.37) ; U48.12@6748.78,3062.32 cw(c6748.78,3040.82) 6763.98,3056.02 ; U48.12@6748.78,3066.32 cw(c6748.78,3054.47) 6757.15,3062.85 ; v1@6914.02,3208.37 cw(c6891.09,3208.37) 6907.31,3192.16 cw(c6923.52,3175.94) v1@6923.52,3198.87 ; v1@6918.02,3208.37 cw(c6904.75,3208.37) 6914.14,3198.99 cw(c6923.52,3189.6) v1@6923.52,3202.87
  MidLayer2 w4: v1(6123.52,3703.71) 6278.19,3703.71 6490.19,3491.71 6590.19,3491.71 6615.19,3516.71 6931.86,3516.71 6948.52,3500.04 6948.52,3233.37 v1(6923.52,3208.37) ; v1@6127.41,3699.82 cw(c6136.8,3690.43) 6136.8,3703.71 cw(c6136.8,3716.99) v1@6127.41,3707.6 ; v1@6130.24,3696.99 cw(c6146.46,3680.77) 6146.46,3703.71 cw(c6146.46,3726.64) v1@6130.24,3710.43 ; v1@6923.52,3213.87 ccw(c6923.52,3227.15) 6932.91,3217.76 ccw(c6942.3,3208.37) v1@6929.02,3208.37 ; v1@6923.52,3217.87 ccw(c6923.52,3240.81) 6939.74,3224.59 ccw(c6955.96,3208.37) v1@6933.02,3208.37
  Bottom Layer w4: v1(5950.52,3957.37) 5953.86,3957.37 5956.86,3954.37 6006.86,3954.37 6015.19,3946.04 6015.19,3925.04 6040.19,3900.04 6040.81,3899.42 6040.81,3829.38 6040.81,3739.19 ; v1@5954.41,3961.26 ccw(c5971.04,3977.9) 5971.04,3954.37 ; v1@5957.24,3950.66 cw(c5966.22,3941.68) 5966.22,3954.37 ; v1@5957.24,3964.09 ccw(c5980.7,3987.55) 5980.7,3954.37 ; 6040.81,3780 6040.81,3739.19 ; v1@6116.81,3696.99 ccw(c6100.59,3680.77) 6100.59,3703.71 ccw(c6100.59,3726.64) v1@6116.81,3710.43 ; v1@6119.64,3699.82 ccw(c6110.25,3690.43) 6110.25,3703.71 ccw(c6110.25,3716.99) v1@6119.64,3707.6 ; v1(6123.52,3703.71) 6076.29,3703.71 6040.81,3739.19
TFT_TSC.TFT_INT: R215.2 U8.AE25 U48.11 | length 2453.6
  Top Layer w4: v1(5911.52,3575.04) 5897.36,3560.87 5875.28,3560.87 5865.02,3571.13 5865.02,3585.62 5872.81,3593.41 5872.81,3612.38 5858.26,3626.92 5858.26,3660 5858.26,3670 5858.26,3717.53 ; v1@6673.52,3048.87 cw(c6673.52,3025.94) 6689.74,3042.16 cw(c6705.96,3058.37) v1@6683.02,3058.37 ; v1@6673.52,3052.87 cw(c6673.52,3039.6) 6682.91,3048.99 cw(c6692.3,3058.37) v1@6679.02,3058.37 ; v1(6673.52,3058.37) 6690.28,3041.61 U48.11@6722.2,3041.61 ; v1@6678.16,3053.74 ccw(c6695.63,3071.21) U48.11@6695.63,3046.5 ; 6684.99,3046.91 ccw(c6695.63,3057.56) U48.11@6695.63,3042.5 ; R215.2@6831.18,2685 6858.48,2685 6865.19,2691.71 v1(6873.52,2691.71) ; R215.2@6834.94,2681.24 cw(c6844.02,2672.16) 6844.02,2685 cw(c6844.02,2697.84) R215.2@6834.94,2688.76 ; R215.2@6837.77,2678.41 cw(c6853.68,2662.5) 6853.68,2685 cw(c6853.68,2707.5) R215.2@6837.77,2691.59 ; 5855.29,3724.71 cw(c5848.11,3717.53) 5858.26,3717.53 ; 5855.29,3724.71 cw(c5848.11,3717.53) 5858.26,3717.53 ; 5855.29,3724.71 ccw(c5842.76,3712.17) 5842.76,3729.9 cw(c5842.76,3712.17) 5855.29,3724.71 ; 5855.29,3724.71 cw(c5867.83,3737.24) 5850.1,3737.24 ccw(c5867.83,3737.24) 5855.29,3724.71
  MidLayer2 w4: v1(5911.52,3575.04) 5995.54,3575.04 6048.52,3522.06 6048.52,3471.48 6069.63,3450.37 6103.54,3450.37 6203.88,3350.04 6270.54,3350.04 6286.54,3334.04 6645,3334.04 6656.86,3334.04 6661.88,3334.04 6690.19,3305.73 6690.19,3300.71 6690.19,3285 6690.19,3075.04 v1(6673.52,3058.37) 6740.86,3058.37 6757.52,3041.71 6816.86,3041.71 6873.52,2985.04 v1(6873.52,2691.71) ; v1@5915.41,3571.15 cw(c5924.8,3561.76) 5924.8,3575.04 cw(c5924.8,3588.32) v1@5915.41,3578.93 ; v1@5918.24,3568.32 cw(c5934.46,3552.11) 5934.46,3575.04 cw(c5934.46,3597.98) v1@5918.24,3581.76 ; v1@6673.52,3063.87 ccw(c6673.52,3077.15) 6682.91,3067.76 ccw(c6692.3,3058.37) v1@6679.02,3058.37 ; v1@6673.52,3067.87 ccw(c6673.52,3090.81) 6689.74,3074.59 ccw(c6705.96,3058.37) v1@6683.02,3058.37 ; v1@6677.41,3054.49 cw(c6686.8,3045.1) 6686.8,3058.37 cw(c6686.8,3071.65) v1@6677.41,3062.26 ; v1@6680.24,3051.66 cw(c6696.46,3035.44) 6696.46,3058.37 cw(c6696.46,3081.31) v1@6680.24,3065.09 ; v1@6866.81,2698.43 ccw(c6850.59,2714.64) 6873.52,2714.64 ccw(c6896.46,2714.64) v1@6880.24,2698.43 ; v1@6869.64,2695.6 ccw(c6860.25,2704.99) 6873.52,2704.99 ccw(c6886.8,2704.99) v1@6877.41,2695.6
TMS: R68.2 U8.D4 | length 4995.7
  Top Layer w4: v1@4188.52,4307.04 v1(4181.86,4307.04) 4181.86,4291.52 4215,4258.37 4353.88,4258.37 4373.86,4238.39 4373.86,4158.04 4398.52,4133.37 4465.19,4133.37 4506.86,4091.71 v1(4506.86,4043.37) ; v1@4250.14,4313.76 ccw(c4233.92,4329.98) 4256.86,4329.98 ccw(c4279.79,4329.98) v1@4263.57,4313.76 ; v1@4252.97,4310.93 ccw(c4243.58,4320.32) 4256.86,4320.32 ccw(c4270.14,4320.32) v1@4260.75,4310.93 ; v1(4256.86,4307.04) 4256.86,4356.67 4265.19,4365 4265.19,4800.04 v1(4298.52,4833.37) ; v1@4289.02,4833.37 cw(c4266.09,4833.37) 4282.31,4817.16 cw(c4298.52,4800.94) v1@4298.52,4823.87 ; v1@4293.02,4833.37 cw(c4279.75,4833.37) 4289.14,4823.99 cw(c4298.52,4814.6) v1@4298.52,4827.87 ; v1@4500.14,4050.09 ccw(c4483.92,4066.31) 4506.86,4066.31 ccw(c4529.79,4066.31) v1@4513.57,4050.09 ; v1@4502.97,4047.26 ccw(c4493.58,4056.65) 4506.86,4056.65 ccw(c4520.14,4056.65) v1@4510.75,4047.26 ; v1(4870.52,4833.37) 4890.94,4833.37 ; v1@4874.73,4829.83 cw(c4882.34,4823.43) 4882.34,4833.37 cw(c4882.34,4843.32) v1@4874.73,4836.92 ; v1@4877.79,4827.26 cw(c4890.94,4816.19) 4890.94,4833.37 ; v1@4877.79,4839.49 ccw(c4890.94,4850.56) 4890.94,4833.37 ; 4952.75,4724.74 4952.75,4720 ; v1@5542.81,3223.43 ccw(c5526.59,3239.64) 5549.52,3239.64 ccw(c5572.46,3239.64) v1@5556.24,3223.43 ; v1@5542.81,3252.66 cw(c5526.59,3236.44) 5549.52,3236.44 cw(c5572.46,3236.44) v1@5556.24,3252.66 ; v1@5545.64,3220.6 ccw(c5536.25,3229.99) 5549.52,3229.99 ccw(c5562.8,3229.99) v1@5553.41,3220.6 ; v1@5545.64,3255.49 cw(c5536.25,3246.1) 5549.52,3246.1 cw(c5562.8,3246.1) v1@5553.41,3255.49 ; v1(5549.52,3216.71) v1(5549.52,3259.37) ; 4890.94,4833.37 4895.31,4833.37 4952.75,4775.93 4952.75,4771.56 4952.75,4764 4952.75,4720 ; 4952.75,4720 4952.75,4710 4952.75,4643.27 ccw(c4962.9,4643.27) 4955.73,4636.09 4955.73,4635.87 4963.64,4627.95 ccw(c4976.61,4642.76) 4976.61,4623.07 cw(c4976.61,4603.38) 4996.3,4603.39 4996.3,4591.94 ccw(c5015.98,4591.94) 5002.06,4578.03 5002.06,4577.94 5003.45,4576.55 ; 5003.45,4576.55 cw(c4990.92,4564.02) 5008.64,4564.02 ccw(c4990.92,4564.02) 5003.45,4576.55 ; 5003.45,4576.55 ccw(c5015.98,4589.08) 5015.98,4571.36 cw(c5015.98,4589.08) 5003.45,4576.55
  MidLayer1 w4: 4476.41,4021.26 cw(c4506.86,3990.82) v1@4506.86,4033.87 ; 4483.24,4028.09 cw(c4506.86,4004.48) v1@4506.86,4037.87 ; 4490.07,4034.92 cw(c4506.86,4018.14) v1@4506.86,4041.87 ; v1(4506.86,4043.37) 4498.52,4043.37 4462.52,4007.37 4462.52,3702.71 4490.19,3675.04 4632.52,3675.04 4673.52,3634.04 4673.52,3575.04 4790.19,3458.37 4790.19,3375.04 v1(4856.86,3308.37) ; v1@4847.36,3308.37 ccw(c4824.42,3308.37) 4840.64,3324.59 ccw(c4856.86,3340.81) v1@4856.86,3317.87 ; v1@4851.36,3308.37 ccw(c4838.08,3308.37) 4847.47,3317.76 ccw(c4856.86,3327.15) v1@4856.86,3313.87
  MidLayer2 w4: v1(4181.86,4307.04) v1(4256.86,4307.04) ; v1@4185.75,4303.15 cw(c4195.14,4293.76) 4195.14,4307.04 cw(c4195.14,4320.32) v1@4185.75,4310.93 ; v1@4188.57,4300.32 cw(c4204.79,4284.11) 4204.79,4307.04 cw(c4204.79,4329.98) v1@4188.57,4313.76 ; v1@4250.14,4300.32 ccw(c4233.92,4284.11) 4233.92,4307.04 ccw(c4233.92,4329.98) v1@4250.14,4313.76 ; v1@4252.97,4303.15 ccw(c4243.58,4293.76) 4243.58,4307.04 ccw(c4243.58,4320.32) v1@4252.97,4310.93
  Bottom Layer w4: v1(4298.52,4833.37) v1(4870.52,4833.37) ; v1@4302.41,4829.49 cw(c4311.8,4820.1) 4311.8,4833.37 cw(c4311.8,4846.65) v1@4302.41,4837.26 ; v1@4305.24,4826.66 cw(c4321.46,4810.44) 4321.46,4833.37 cw(c4321.46,4856.31) v1@4305.24,4840.09 ; v1(4856.86,3308.37) 4910.84,3308.37 4973.84,3245.37 5110.5,3245.37 5139.17,3216.71 ; v1@4860.75,3304.49 cw(c4870.14,3295.1) 4870.14,3308.37 cw(c4870.14,3321.65) v1@4860.75,3312.26 ; v1@4863.57,3301.66 cw(c4879.79,3285.44) 4879.79,3308.37 cw(c4879.79,3331.31) v1@4863.57,3315.09 ; v1@4863.81,4826.66 ccw(c4847.59,4810.44) 4847.59,4833.37 ccw(c4847.59,4856.31) v1@4863.81,4840.09 ; v1@4866.64,4829.49 ccw(c4857.25,4820.1) 4857.25,4833.37 ccw(c4857.25,4846.65) v1@4866.64,4837.26 ; 5110.88,3245 5139.17,3216.71 ; v1(5549.52,3216.71) 5535,3231.23 5521.33,3231.23 5511.52,3241.04 5455.54,3241.04 5439.54,3225.04 5303.88,3225.04 5286.88,3208.04 5147.84,3208.04 5139.17,3216.71 ; v1(5549.52,3259.37) 5569,3259.37 5576.12,3266.5 5617.4,3266.5 5631.86,3252.04 5631.86,3221.37 5645.86,3207.37 5665,3207.37 5677.38,3195 R68.2@5705.82,3195 ; v1@5557.01,3253.53 cw(c5569,3244.17) 5569,3259.37 cw(c5569,3274.58) v1@5557.01,3265.22 ; R68.2@5699.23,3188.41 ccw(c5683.32,3172.5) 5683.32,3195 ccw(c5683.32,3217.5) R68.2@5699.23,3201.59 ; R68.2@5702.06,3191.24 ccw(c5692.98,3182.16) 5692.98,3195 ccw(c5692.98,3207.84) R68.2@5702.06,3198.76
TSC_3V3: NT42.1 U48.1 U48.9 U48.10 | length 4715.8
  Top Layer w4: v1@5658.47,2593.32 cw(c5642.26,2577.11) 5665.19,2577.11 cw(c5688.13,2577.11) v1@5671.91,2593.32 ; v1@5661.3,2596.15 cw(c5651.91,2586.76) 5665.19,2586.76 cw(c5678.47,2586.76) v1@5669.08,2596.15 ; v1(5665.19,2600.04) 5665.19,2508.37 5715.19,2458.37 5977.52,2458.37 6111.97,2592.82 6131.51,2592.82 6157.19,2618.5 6157.19,2642.04 6223.52,2708.37 ; v1@6234.51,2702.78 ccw(c6223.52,2694.79) 6223.52,2708.37 ; v1@6234.51,2713.97 cw(c6223.52,2721.96) 6223.52,2708.37 ; v1(6242.19,2708.37) 6223.52,2708.37 ; U48.1@6498.52,3169.57 U48.1@6497.8,3169.57 6559.33,3169.57 v1(6570.52,3158.37) ; U48.1@6527.83,3166.11 cw(c6536.17,3157.76) 6536.17,3169.57 cw(c6536.17,3181.37) U48.1@6527.83,3173.02 ; v1@6668.24,3005.01 ccw(c6663.88,3012.86) 6672.86,3012.86 ; v1@6673.92,2997.77 ccw(c6691.63,3015.48) U48.9@6691.63,2990.43 ; v1@6676.75,3000.6 ccw(c6701.28,3025.13) U48.9@6701.28,2990.43 ; v1@6677.47,3005.01 cw(c6681.83,3012.86) 6672.86,3012.86 ; v1@6679.57,3003.43 ccw(c6710.94,3034.79) U48.9@6710.94,2990.43 ; U48.9@6692.17,2986.98 ccw(c6683.83,2978.63) 6683.83,2990.43 ccw(c6683.83,3002.24) U48.9@6692.17,2993.89 ; U48.10@6692.17,3012.57 ccw(c6683.83,3004.22) 6683.83,3016.02 ccw(c6683.83,3027.83) U48.10@6692.17,3019.48 ; U48.9@6722.2,2990.43 6679.13,2990.43 v1(6672.86,2996.71) 6672.86,3012.86 ; U48.10@6722.2,3016.02 6676.02,3016.02 6672.86,3012.86
  MidLayer1 w4: v1@6232.69,2708.37 cw(c6209.76,2708.37) 6225.97,2692.16 cw(c6242.19,2675.94) v1@6242.19,2698.87 ; v1@6236.69,2708.37 cw(c6223.41,2708.37) 6232.8,2698.99 cw(c6242.19,2689.6) v1@6242.19,2702.87 ; v1(6242.19,2708.37) 6223.52,2689.71 6223.52,2557.71 6264.52,2516.71 6331.86,2516.71 6348.52,2533.37 6348.52,2583.37 6373.52,2608.37 6406.86,2608.37 6415.19,2616.71 6432.86,2616.71 6457.86,2591.71 6478.86,2591.71 6522.81,2635.66 6522.81,2662.38 6515.19,2670 6515.19,2816.71 6556.86,2858.37 6556.86,3070 6585,3098.14 6585,3143.9 v1(6570.52,3158.37)
  MidLayer2 w4: v1@4418.14,2515.09 ccw(c4401.92,2531.31) 4424.86,2531.31 ccw(c4447.79,2531.31) v1@4431.57,2515.09 ; v1@4420.97,2512.26 ccw(c4411.58,2521.65) 4424.86,2521.65 ccw(c4438.14,2521.65) v1@4428.75,2512.26 ; v1(4424.86,2508.37) 4424.86,2649.9 4450,2675.04 4939.79,2675.04 4981.46,2716.71 5153.21,2716.71 5178.54,2691.37 5235.17,2691.37 5243.84,2700.04 5487.21,2700.04 5545,2642.25 5545,2568.37 5555,2558.37 5623.52,2558.37 v1(5665.19,2600.04) ; v1@5655.69,2600.04 cw(c5632.76,2600.04) 5648.97,2583.82 cw(c5665.19,2567.61) v1@5665.19,2590.54 ; v1@5659.69,2600.04 cw(c5646.41,2600.04) 5655.8,2590.65 cw(c5665.19,2581.26) v1@5665.19,2594.54
  Bottom Layer w4: v1@4428.75,2504.49 cw(c4438.14,2495.1) 4438.14,2508.37 cw(c4438.14,2521.65) v1@4428.75,2512.26 ; v1@4431.57,2501.66 cw(c4447.79,2485.44) 4447.79,2508.37 cw(c4447.79,2531.31) v1@4431.57,2515.09 ; v1@4431.56,2508.37 cw(c4431.56,2474.71) NT42.1@4461.19,2490.7 ; 4438.27,2508.37 cw(c4438.27,2478.33) NT42.1@4464.71,2492.6 ; 4444.97,2508.37 cw(c4444.97,2481.95) NT42.1@4468.23,2494.5 ; 4451.68,2508.37 cw(c4451.68,2485.57) NT42.1@4471.75,2496.4 ; NT42.1@4457.67,2488.8 ccw(c4424.86,2471.1) v1(4424.86,2508.37) 4466.63,2508.37 4469.76,2505.24 NT42.1@4469.76,2485.08 NT42.1@4469.76,2483.37 ; NT42.1@4458.38,2508.37 cw(c4458.38,2489.19) NT42.1@4475.27,2498.3 ; v1@6570.52,3148.87 cw(c6570.52,3125.94) 6586.74,3142.16 cw(c6602.96,3158.37) v1@6580.02,3158.37 ; v1@6570.52,3152.87 cw(c6570.52,3139.6) 6579.91,3148.99 cw(c6589.3,3158.37) v1@6576.02,3158.37 ; v1(6570.52,3158.37) 6640.19,3088.71 6640.19,3029.37 v1(6672.86,2996.71) ; v1@6663.36,2996.71 ccw(c6640.42,2996.71) 6656.64,3012.93 ccw(c6672.86,3029.14) v1@6672.86,3006.21 ; v1@6667.36,2996.71 ccw(c6654.08,2996.71) 6663.47,3006.1 ccw(c6672.86,3015.49) v1@6672.86,3002.21
UIO_PWR.AIN: JP1.1 JP1.4 UH1.1 | length 680
  Bottom Layer w20: JP1.1@675.1,4713.08 JP1.4@775.1,4813.08 823.52,4813.08 923.37,4713.23 UH1.1@976.12,4713.23 ; JP1.1@675.1,4732.6 ccw(c675.1,4779.75) 708.43,4746.41 ccw(c741.77,4713.08) JP1.1@694.62,4713.08 ; JP1.4@755.57,4813.08 cw(c708.43,4813.08) 741.76,4779.74 cw(c775.1,4746.41) JP1.4@775.1,4793.55 ; JP1.4@788.91,4799.27 cw(c822.24,4765.93) 822.24,4813.08 cw(c822.24,4860.22) JP1.4@788.91,4826.89 ; UH1.1@962.31,4699.43 ccw(c928.98,4666.09) 928.98,4713.23 ccw(c928.98,4760.38) UH1.1@962.31,4727.04
UIO_PWR.BIN: JP2.1 JP2.4 UH2.1 | length 668.7
  Top Layer w20: JP2.1@2072.74,4713.08 JP2.4@2172.74,4813.08 2215.19,4813.08 ; JP2.1@2072.74,4732.6 ccw(c2072.74,4779.75) 2106.07,4746.41 ccw(c2139.41,4713.08) JP2.1@2092.26,4713.08 ; JP2.4@2153.21,4813.08 cw(c2106.06,4813.08) 2139.4,4779.74 cw(c2172.74,4746.41) JP2.4@2172.74,4793.55 ; JP2.4@2187.56,4800.37 cw(c2215.19,4776.69) 2215.19,4813.08 ; JP2.4@2187.56,4825.78 ccw(c2215.19,4849.46) 2215.19,4813.08 ; UH2.1@2359.95,4699.43 ccw(c2326.62,4666.09) 2326.62,4713.23 ccw(c2326.62,4760.38) UH2.1@2359.95,4727.04 ; UH2.1@2373.76,4713.23 2315.03,4713.23 2215.19,4813.08
USB_RSTA: R271.1 U56.42 U60.2 | length 1069.5
  Bottom Layer w4: U60.2@6044.34,5543.04 cw(c6041.46,5535) 6050,5535 cw(c6058.94,5535) U60.2@6055.57,5543.28 ; U60.2@6050,5570 6050,5535 6060,5525 6081.18,5525 R271.1@6111.18,5495 6281.86,5665.68 6281.86,5931.71 6283.52,5933.37 6406.86,5933.37 6448.52,5891.71 6473.52,5891.71 6482.05,5900.23 U56.42@6482.05,5980.67 ; 6094.43,5511.75 ccw(c6111.18,5528.5) 6111.18,5504.81 ccw(c6111.18,5528.5) 6127.93,5511.75 ; 6095.62,5510.56 cw(c6080.55,5495.49) R271.1@6101.86,5495.49 ; R271.1@6101.26,5504.92 ccw(c6111.18,5514.84) 6111.18,5500.81 ccw(c6111.18,5514.84) R271.1@6121.1,5504.92 ; R271.1@6102.45,5503.73 cw(c6094.21,5495.49) R271.1@6105.86,5495.49 ; R271.1@6116.5,5495.49 cw(c6128.15,5495.49) R271.1@6119.91,5503.73 ; R271.1@6120.5,5495.49 cw(c6141.81,5495.49) 6126.74,5510.56 ; U56.42@6479.22,5966.91 cw(c6472.39,5960.08) 6482.05,5960.08 cw(c6491.7,5960.08) U56.42@6484.88,5966.91
USB_RSTB: R248.1 U19.42 U49.2 | length 1346.2
  MidLayer2 w4: v1@7600.14,1430.32 ccw(c7583.92,1414.11) 7583.92,1437.04 ccw(c7583.92,1459.98) v1@7600.14,1443.76 ; v1@7602.97,1433.15 ccw(c7593.58,1423.76) 7593.58,1437.04 ccw(c7593.58,1450.32) v1@7602.97,1440.93 ; v1(7606.86,1437.04) 7507.04,1437.04 7481.86,1411.86 7481.86,1060 7496.86,1045 7585,1045 7615.19,1014.81 v1(7615.19,958.37) ; v1@7608.47,965.09 ccw(c7592.26,981.31) 7615.19,981.31 ccw(c7638.13,981.31) v1@7621.91,965.09 ; v1@7611.3,962.26 ccw(c7601.91,971.65) 7615.19,971.65 ccw(c7628.47,971.65) v1@7619.08,962.26
  Bottom Layer w4: U19.42@7547.95,904.33 7594.33,904.33 7615.19,925.19 v1(7615.19,958.37) ; U19.42@7550.78,901.5 cw(c7557.61,894.67) 7557.61,904.33 cw(c7557.61,913.99) U19.42@7550.78,907.16 ; v1(7606.86,1437.04) 7634.82,1465 7650,1465 7652.15,1467.15 ; v1@7606.86,1442.54 ccw(c7606.86,1455.82) 7616.25,1446.43 ccw(c7625.64,1437.04) v1@7612.36,1437.04 ; v1@7606.86,1446.54 ccw(c7606.86,1469.48) 7623.07,1453.26 ccw(c7639.29,1437.04) v1@7616.36,1437.04 ; v1@7608.47,951.66 cw(c7592.26,935.44) 7615.19,935.44 cw(c7638.13,935.44) v1@7621.91,951.66 ; v1@7611.3,954.49 cw(c7601.91,945.1) 7615.19,945.1 cw(c7628.47,945.1) v1@7619.08,954.49 ; U49.2@7642.96,1485.08 cw(c7630.04,1467.15) 7652.15,1467.15 ; U49.2@7645.3,1488.33 cw(c7635.67,1474.96) 7652.15,1474.96 cw(c7668.62,1474.96) U49.2@7658.99,1488.33 ; U49.2@7652.15,1506.69 7652.15,1467.15 ; U49.2@7661.33,1485.08 ccw(c7674.25,1467.15) 7652.15,1467.15 ; 7696.93,1456.75 ccw(c7713.68,1473.5) R248.1@7713.68,1449.81 ; 7698.12,1455.56 cw(c7683.05,1440.49) R248.1@7704.36,1440.49 ; R248.1@7703.76,1449.92 ccw(c7713.68,1459.84) R248.1@7713.68,1445.81 ; R248.1@7704.95,1448.73 cw(c7696.71,1440.49) R248.1@7708.36,1440.49 ; R248.1@7713.68,1440 7688.68,1465 7655,1465 7654.29,1465 7652.15,1467.15